# Altium PCB pcb.PcbDoc (part 2 of 2)
Units mil, origin at the board's own origin, x right, y up, seen from the top; angles counter-clockwise.
Board outline 3937.04 x 2086.65 mil, 2 copper layers (Top Layer, Bottom Layer), stack 62.205 mil thick; 127 components, 118 nets, 535 pads, 195 vias.
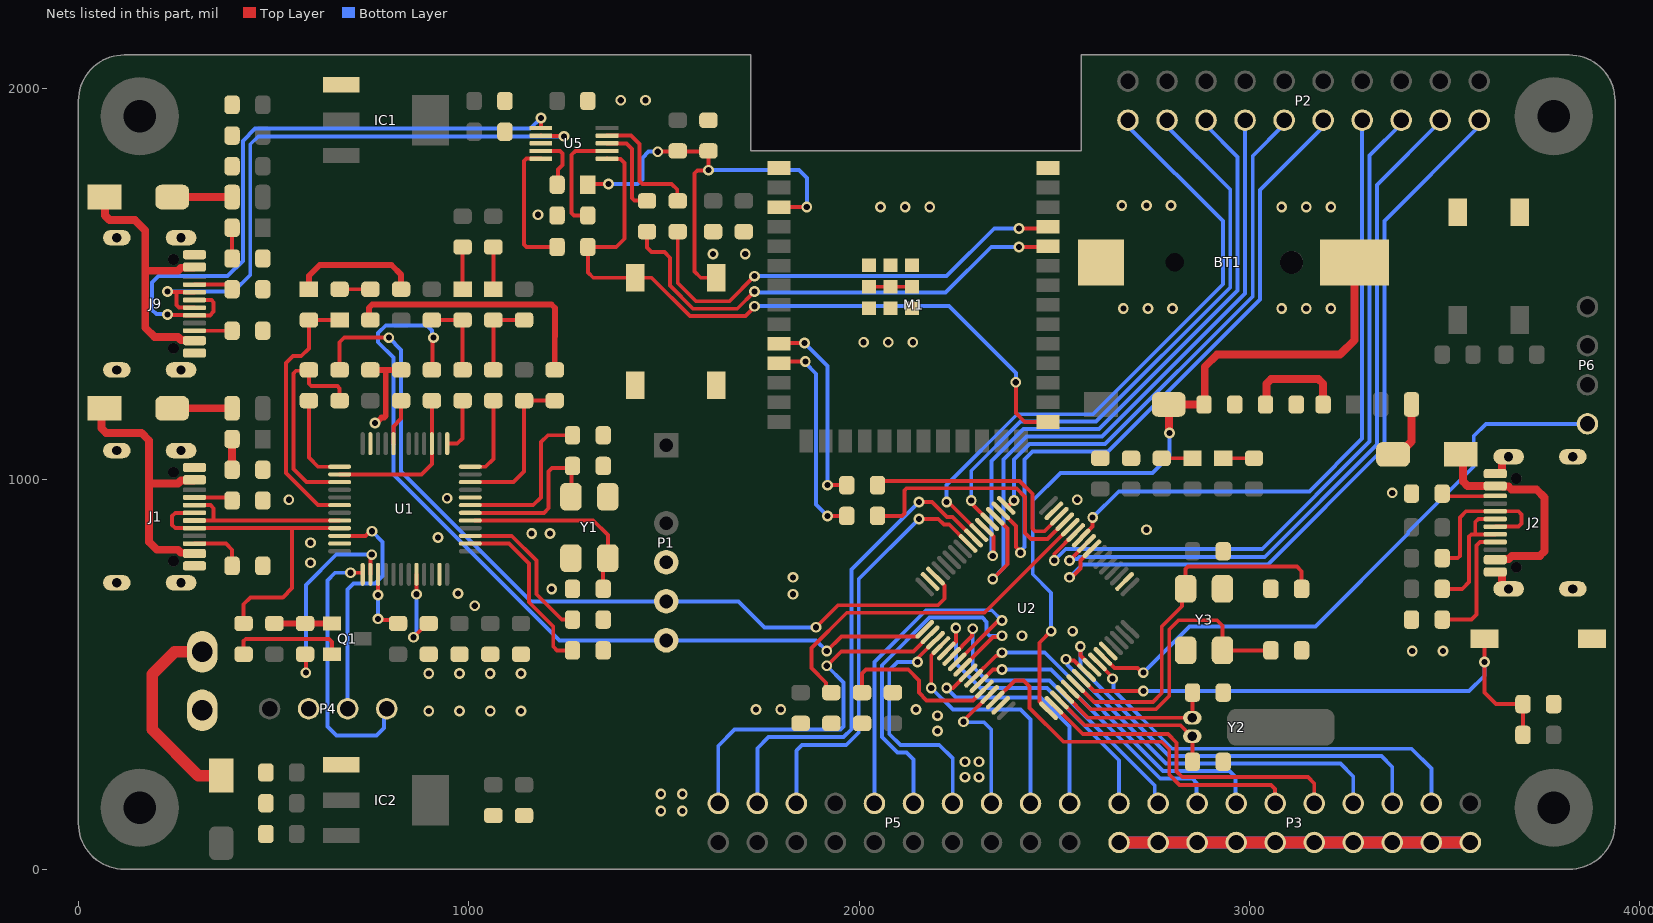
[diagram p2: the nets of this part, all layers, seen from the top]

## Via types
v1: diameter 27.56, hole 15.75, Top Layer to Bottom Layer, tented both sides, 161 vias
v2: diameter 43.31, hole 23.62, Top Layer to Bottom Layer, 32 vias
v3: diameter 27.56, hole 15.75, Top Layer to Bottom Layer, 2 vias

## Nets (pads, with @x,y where several pads share a name; then routed paths per layer and width w, separated by ;. In a path a pad name is that pad's centre, name@x,y a point inside that pad or via, vN(x,y) a via of type N, cw(c..) or ccw(c..) an arc to the next point about the centre after c; other vN are vias at no path point) (continued)
A13: P1.5 R24.1 U2.46 | length 2213.4
  Top Layer w10: R24.1@669.29,1279.52 669.29,1350.4 681.1,1362.2 v1(795.28,1362.2) ; v1(1889.53,620.31) 1890,620.31 1946.17,676.48 2202.07,676.48 2218.95,693.35 2218.95,727.84 2195.86,750.93 U2.46@2195.86,751.42
  Bottom Layer w10: v1(795.28,1362.2) 826.77,1330.71 826.77,1019 1159.15,686.61 P1.5@1505.91,686.61 1691.34,686.61 1757.87,620.08 1889.29,620.08 v1(1889.53,620.31)
A14: P1.6 R16.1 U2.49 | length 2206.5
  Top Layer w10: R16.1@905.51,1279.52 907.48,1281.49 907.48,1360.24 v1(909.45,1362.2) ; v1(1917.32,559.06) 1917.32,559.39 1954.5,596.56 2149.58,596.56 U2.49@2168.03,615.01
  Bottom Layer w10: v1(909.45,1362.2) 906.09,1365.56 906.09,1380.78 893.17,1393.7 787.4,1393.7 767.72,1374.02 767.72,1350.39 807.09,1311.02 807.09,1011.81 1232.28,586.61 P1.6@1505.91,586.61 1889.76,586.61 v1(1917.32,559.06)
A15: P5.19 U2.50 | length 960.3
  Top Layer w10: v1(1917.32,521.5) 1917.64,521.5 1954.42,558.28 2139.13,558.28 U2.50@2181.94,601.09
  Bottom Layer w10: P5.19@1639.37,168.9 1639.37,316.54 1681.1,358.27 1952.76,358.27 1960.63,366.14 1960.63,478.19 v1(1917.32,521.5)
B0: P2.8 U2.26 | length 1654.7
  Top Layer w10: U2.26@2568.9,848.85 2598.43,878.37 v1(2598.43,901.57)
  Bottom Layer w10: v1(2598.43,901.57) 2665.35,968.5 3153.54,968.5 3288.98,1103.94 P2.8@3288.98,1919.29
B1: P2.6 U2.27 | length 1885.3
  Top Layer w10: v1(2500,791.34) 2500,807.79 U2.27@2554.99,862.77
  Bottom Layer w10: v1(2500,791.34) 2529.53,820.87 3032.97,820.87 3307.98,1095.87 3307.98,1828.33 3388.98,1909.33 P2.6@3388.98,1919.29
B2/boot1: R20.1 U2.28 | length 926.8
  Top Layer w10: R20.1@1929.13,452.76 1915.66,466.23 1915.66,478.04 1877.95,515.75 1877.95,566.93 1968.5,657.48 2321.86,657.48 U2.28@2541.07,876.69
B3: P5.11 U2.55 | length 913.7
  Top Layer w10: U2.55@2251.54,531.49 2354.49,634.44 2362.78,634.44 v1(2366.14,637.8)
  Bottom Layer w10: P5.11@2039.37,168.9 2039.37,531.5 2171.76,663.89 2340.05,663.89 v1(2366.14,637.8)
B4: P5.9 U2.56 | length 929.3
  Top Layer w10: U2.56@2265.46,517.57 2265.53,517.57 2343.03,595.07 2362.78,595.07 v1(2366.14,598.43)
  Bottom Layer w10: P5.9@2139.37,168.9 2139.37,281.89 2122.05,299.21 2098.43,299.21 2058.37,339.27 2058.37,522.94 2180.32,644.89 2315.74,644.89 2326.77,633.86 2326.77,606.3 2334.65,598.43 v1(2366.14,598.43)
B5: P5.1 U2.57 | length 624.1
  Top Layer w10: v1(2224.41,464.57) 2240.3,464.57 U2.57@2279.38,503.65
  Bottom Layer w10: v1(2224.41,464.57) 2248.31,440.67 2464.84,440.67 2539.37,366.14 P5.1@2539.37,168.9
B6: P3.13 U2.58 | length 899.6
  Top Layer w10: U2.58@2293.3,489.73 2350.81,547.24 2360.28,547.24 2366.14,553.1 v1(2366.14,555.12)
  Bottom Layer w10: v1(2366.14,555.12) 2475.69,555.12 2778.84,251.97 2948.82,251.97 2964.57,236.22 2964.57,170.47 P3.13@2966.14,168.9
B7: P3.15 U2.59 | length 745.9
  Top Layer w10: U2.59@2307.22,475.81 2343.22,511.81 v1(2366.14,511.81)
  Bottom Layer w10: v1(2366.14,511.81) 2492.13,511.81 2771.65,232.28 2853.94,232.28 2864.87,221.35 2864.87,170.17 P3.15@2866.14,168.9
B8: P5.5 U2.61 | length 366.6
  Top Layer w10: v1(2267.72,377.95) 2267.72,380.63 U2.61@2335.06,447.97
  Bottom Layer w10: v1(2267.72,377.95) 2268.94,376.73 2320.12,376.73 2338.58,358.27 2338.58,169.68 P5.5@2339.37,168.9
B9: P3.11 U2.62 | length 960.4
  Top Layer w10: U2.62@2348.98,434.05 2399.18,484.25 2421.26,484.25 2437.01,468.5 2437.01,413.39 2523.62,326.77 2775.59,326.77 2794.59,307.77 2794.59,242.81 2820.87,216.54 3055.12,216.54 3066.05,205.6 3066.05,168.98 P3.11@3066.14,168.9
B10: R27.2 U2.29 | length 670
  Top Layer w10: R27.2@2047.25,905.52 2110.28,905.51 2116.14,911.37 2116.14,970.52 2122,976.38 2403.23,976.38 2425.2,954.42 2425.2,862.2 2440.94,846.46 2482.99,846.46 U2.29@2527.15,890.61
B11: R28.2 U2.30 | length 592.5
  Top Layer w10: R28.2@2047.24,984.25 2058.37,995.38 2411.1,995.38 2444.2,962.29 2444.2,872.73 2450.79,866.14 2474.84,866.14 U2.30@2513.23,904.53
B12: P2.12 U2.33 | length 1402.4
  Top Layer w10: U2.33@2376.82,932.37 2379.99,929.2 2381.17,929.2 v1(2396.86,944.88)
  Bottom Layer w10: v1(2396.86,944.88) 2396.86,1049.91 2436.81,1089.87 2630.42,1089.87 3008.56,1468.01 3008.56,1827.46 3088.98,1907.87 P2.12@3088.98,1919.29
B13: P2.10 U2.34 | length 1671.3
  Top Layer w10: U2.34@2362.9,918.45 2401.57,879.77 2401.57,825.66 2413.39,813.85 v1(2413.39,811.02)
  Bottom Layer w10: v1(2413.39,811.02) 2413.39,815.41 2423.64,825.66 2423.64,1049.82 2444.68,1070.87 2638.29,1070.87 3027.56,1460.14 3027.56,1740.16 3188.98,1901.57 P2.10@3188.98,1919.29
B14: P2.14 U2.35 | length 1745.3
  Top Layer w10: v1(2342.52,744.09) 2380.08,781.65 2380.08,873.43 U2.35@2348.98,904.53
  Bottom Layer w10: v1(2342.52,744.09) 2370.08,771.65 2370.08,1050 2428.94,1108.87 2550.5,1108.87 2622.55,1108.87 2988.98,1475.3 P2.14@2988.98,1919.29
B15: P2.18 U2.36 | length 1503.8
  Top Layer w10: v1(2287.4,944.88) 2290.76,941.52 2290.76,934.91 U2.36@2335.06,890.61
  Bottom Layer w10: v1(2287.4,944.88) 2287.4,1021.06 2413.2,1146.87 2534.76,1146.87 2606.81,1146.87 2950.98,1491.04 2950.98,1563.08 2950.98,1741.54 2788.98,1903.54 P2.18@2788.98,1919.29
BATT: BT1.1 C23.2 D4.2 U2.1 | length 1909.6
  Top Layer w10: U2.1@2485.39,406.21 2485.39,406.7 2462.31,429.79 2462.31,580.42 v1(2492.13,610.24)
  Top Layer w20: v1(2795.28,1118.11) 2794.29,1119.09 2794.29,1189.96 D4.2@2793.31,1190.94 C23.2@2883.86,1190.94 2885.83,1192.91 2885.83,1287.4 2917.32,1318.9 3232.28,1318.9 3269.69,1356.3 BT1.1@3269.69,1555.12
  Bottom Layer w10: v1(2492.13,610.24) 2492.13,708.66 2444.88,755.91 2444.88,944.88 2515.75,1015.75 2751.97,1015.75 2795.28,1059.06 v1(2795.28,1118.11)
BOOT: BOOT.1 M1.27 R49.1 U5.6 | length 1830.9
  Top Layer w10: U5.6@1354.3,1820.65 1354.81,1820.14 1388.52,1820.14 1399.01,1809.65 1399.01,1615.54 1377.95,1594.49 R49.1@1305.11,1594.49 1305.11,1529.53 1318.9,1515.75 BOOT.1@1427.17,1515.75 1468.5,1515.75 1566.93,1417.32 1708.66,1417.32 1732.28,1440.94 v1(1732.28,1442.76) ; v1(2401.57,1248.03) 2401.57,1169.29 2424.41,1146.46 M1.27@2484.25,1146.46
  Bottom Layer w10: v1(1732.28,1442.76) 2230.47,1442.76 2401.57,1271.65 v1(2401.57,1248.03)
BOOT0: R4.1 U1.44 | length 218.7
  Top Layer w10: v1(858.27,594.49) 893.7,629.92 R4.1@897.64,629.92 ; v1(866.14,704.72) U1.44@866.14,755.91
  Bottom Layer w10: v1(858.27,594.49) 858.27,599.24 866.14,607.11 v1(866.14,704.72)
BOOT1: R7.1 U1.20 | length 118.4
  Top Layer w10: U1.20@807.08,1090.55 807.08,1134.84 826.77,1154.52 R7.1@826.77,1200.79
C0: P3.7 U2.8 | length 1002.1
  Top Layer w10: v1(2530.49,538.19) 2533.25,535.43 2551.04,535.43 U2.8@2582.82,503.65
  Bottom Layer w10: v1(2530.49,538.19) 2533.84,534.83 2533.84,523.83 2547.93,509.75 2786.71,270.97 3232.97,270.97 3266.14,237.8 P3.7@3266.14,168.9
C1: P3.5 U2.9 | length 1117
  Top Layer w10: v1(2566.93,570.87) 2566.93,547.38 U2.9@2596.74,517.57
  Bottom Layer w10: v1(2566.93,570.87) 2566.93,517.62 2794.58,289.97 3338.03,289.97 3366.14,261.86 P3.5@3366.14,168.9
C2: P3.3 U2.10 | length 1076
  Top Layer w10: U2.10@2610.66,531.49 2610.66,531 2649.61,492.06 v1(2649.61,488.19)
  Bottom Layer w10: v1(2649.61,488.19) 2652.01,485.79 2652.01,459.41 2802.45,308.97 3415.44,308.97 3466.14,258.27 P3.3@3466.14,168.9
C3: P6.1 U2.11 | length 1571.2
  Top Layer w10: U2.11@2624.58,545.41 2654.24,515.75 2713.71,515.75 2725.52,503.94 v1(2728.35,503.94)
  Bottom Layer w10: v1(2728.35,503.94) 2846.17,621.76 3169.01,621.76 3407.14,859.89 3407.14,864.52 3574.8,1032.19 3574.8,1110.24 3605.91,1141.34 P6.1@3866.14,1141.34
C4: P2.2 U2.24 | length 1983.5
  Top Layer w10: v1(2539.37,748.03) 2544.12,748.03 2566.93,770.84 2566.93,791.2 U2.24@2596.74,821.01
  Bottom Layer w10: v1(2539.37,748.03) 2572.75,781.41 3047.26,781.41 3345.98,1080.13 3345.98,1660.94 3588.98,1903.94 P2.2@3588.98,1919.29
C5: P2.4 U2.25 | length 1870.5
  Top Layer w10: v1(2539.37,791.34) v1(2539.37,791.34) 2582.82,834.86 U2.25@2582.82,834.93
  Bottom Layer w10: v1(2539.37,791.34) 2542.73,794.7 2559.17,794.7 2564.88,800.41 3039.39,800.41 3326.98,1088 3326.98,1753.75 3488.98,1915.75 P2.4@3488.98,1919.29
C6: P2.16 U2.37 | length 1609.5
  Top Layer w10: U2.37@2321.14,876.69 2321.14,876.2 2344.22,853.12 2344.22,804.85 v1(2342.52,803.15)
  Bottom Layer w10: v1(2342.52,803.15) 2339.27,806.4 2339.27,1046.06 2421.07,1127.87 2542.63,1127.87 2614.68,1127.87 2969.98,1483.17 2969.98,1555.21 2969.98,1825.3 2888.98,1906.3 P2.16@2888.98,1919.29
C7: P2.20 U2.38 | length 1600.7
  Top Layer w10: v1(2224.41,940.94) 2228.56,940.94 2306.73,862.77 U2.38@2307.22,862.77
  Bottom Layer w10: v1(2224.41,940.94) 2224.41,984.94 2405.33,1165.87 2598.94,1165.87 2931.98,1498.91 2931.98,1660.54 2688.98,1903.54 P2.20@2688.98,1919.29
C8: P5.17 U2.39 | length 1234.1
  Top Layer w10: v1(2153.54,940.94) 2186.54,940.94 2225.13,902.35 2239.8,902.35 U2.39@2293.3,848.85
  Bottom Layer w10: P5.17@1739.37,168.9 1739.37,310.24 1768.4,339.27 1960.63,339.27 1980.32,358.96 1980.32,767.72 v1(2153.54,940.94)
C9: P5.15 U2.40 | length 1076.8
  Top Layer w10: v1(2153.54,897.64) 2202.97,897.64 2217.26,883.35 2230.96,883.35 U2.40@2279.38,834.93
  Bottom Layer w10: P5.15@1839.37,168.9 1839.37,303.94 1854.33,318.9 1967.13,318.9 1999.32,351.09 1999.32,743.41 v1(2153.54,897.64)
C10: P5.7 U2.51 | length 623.1
  Top Layer w10: v1(2149.61,531.5) 2152.97,534.86 2152.97,544.27 U2.51@2195.86,587.17
  Bottom Layer w10: v1(2149.61,531.5) 2098.43,531.5 2077.37,510.44 2077.37,347.14 2106.3,318.21 2205.41,318.21 2240.16,283.46 2240.16,169.68 P5.7@2239.37,168.9
C11: P5.3 U2.52 | length 621.4
  Top Layer w10: v1(2185.04,464.57) 2185.04,548.01 2209.78,572.76 U2.52@2209.78,573.25
  Bottom Layer w10: v1(2185.04,464.57) 2240.16,409.45 2413.39,409.45 2439.37,383.46 P5.3@2439.37,168.9
C12: P3.19 U2.53 | length 790.8
  Top Layer w10: U2.53@2223.7,559.33 2223.7,559.82 2248.03,584.15 v1(2248.03,618.11)
  Bottom Layer w10: v1(2248.03,618.11) 2248.03,527.56 2311.02,464.57 2481,464.57 2666.14,279.43 P3.19@2666.14,168.9
C13: P3.9 U2.2 | length 844
  Top Layer w10: U2.2@2499.31,420.13 2572.98,346.46 2791.34,346.46 2813.59,324.2 2813.59,250.68 2828.05,236.22 3150,236.22 3166.14,220.08 P3.9@3166.14,168.9
CH340_D+: J9.A6 J9.B6 U5.1 | length 1689.7
  Top Layer w10: v1(228.35,1421.26) 229.41,1420.2 272.72,1420.2 273.62,1419.29 336.61,1419.29 346.46,1429.13 346.46,1452.76 340.55,1458.66 J9.A6@297.24,1458.66 ; U5.1@1185.04,1899.43 v1(1185.04,1925.2)
  Bottom Layer w10: v1(228.35,1421.26) 227.13,1422.48 199.57,1422.48 188.98,1433.07 188.98,1503.94 204.72,1519.68 381.89,1519.68 421.26,1559.06 421.26,1866.14 452.76,1897.64 1157.48,1897.64 v1(1185.04,1925.2)
CH340_D-: J9.A7 J9.B7 U5.2 | length 1588.5
  Top Layer w10: v1(228.35,1480.32) 229.41,1479.25 251.06,1479.25 ; J9.A7@297.24,1438.98 297.02,1439.2 257.65,1439.2 251.06,1445.79 251.06,1479.25 ; J9.B7@297.24,1478.35 273.62,1478.35 272.72,1479.25 251.06,1479.25 ; U5.2@1185,1879.71 1185.52,1879.2 1242.85,1879.2 v1(1244.09,1877.95)
  Bottom Layer w10: v1(228.35,1480.32) 397.64,1480.32 440.26,1522.94 440.26,1857.58 460.63,1877.95 v1(1244.09,1877.95)
CH340_RX: R52.2 U5.9 | length 321.8
  Top Layer w10: U5.9@1354.3,1879.71 1415.57,1879.71 1437.01,1858.27 1437.01,1763.78 1444.88,1755.91 1519.69,1755.91 1534.16,1741.43 1534.16,1713.87 R52.2@1535.43,1712.6
CH340_TX: R56.2 U5.8 | length 237.3
  Top Layer w10: U5.8@1354.3,1860.02 1403.76,1860.02 1418.01,1845.77 1418.01,1719.79 1423.93,1713.87 1455.42,1713.87 R56.2@1456.69,1712.6
D2: P3.17 U2.54 | length 831.8
  Top Layer w10: U2.54@2237.62,545.41 2289.59,597.37 2289.59,614.57 v1(2291.34,616.32)
  Bottom Layer w10: v1(2291.34,616.32) 2291.34,519.69 2326.77,484.25 2488.19,484.25 2757.51,214.93 2757.51,177.53 P3.17@2766.14,168.9
DN1: J1.A7 J1.B7 U1.32 | length 456
  Top Layer w10: J1.A7@297.24,893.7 346.46,893.7 ; J1.B7@297.24,933.07 338.58,933.07 346.46,925.2 346.46,893.7 ; U1.32@669.29,893.7 346.46,893.7
DN2: J2.A7 J2.B7 R40.2 | length 347.7
  Top Layer w10: R40.2@3494.1,718.51 3545.28,718.51 3562.99,736.22 3562.99,852.41 3568.85,858.27 3578.74,858.27 ; J2.B7@3629.92,858.27 3578.74,858.27 ; J2.A7@3629.92,897.64 3586.61,897.64 3578.74,889.76 3578.74,858.27
DP1: J1.A6 J1.B6 R11.2 U1.33 | length 861.9
  Top Layer w10: J1.A6@297.24,913.39 248.03,913.39 240.16,905.51 240.16,881.89 248.03,874.02 J1.B6@297.24,874.02 547.24,874.02 551.18,874.02 ; R11.2@423.23,629.92 423.23,679.13 440.94,696.85 523.62,696.85 547.24,720.47 547.24,870.08 551.18,874.02 ; U1.33@669.29,874.03 551.18,874.02
DP2: J2.A6 J2.B6 R41.2 | length 407.3
  Top Layer w10: R41.2@3494.09,797.24 3533.51,797.24 3539.37,803.1 3539.37,901.57 3555.12,917.32 J2.B6@3629.92,917.32 3688.98,917.32 3696.85,909.45 3696.85,885.83 3688.98,877.95 J2.A6@3629.92,877.95
ESP_RST: C43.2 D7.1 ESP_RST.1 M1.3 R59.1 | length 1184.7
  Top Layer w10: D7.1@1305.12,1753.94 1307.09,1755.91 v1(1358.27,1755.91) ; v1(1484.25,1838.58) 1485.24,1839.57 1613.19,1839.57 C43.2@1614.17,1840.55 v1(1614.17,1791.34) 1613.67,1790.83 1586.11,1790.83 1578.74,1783.46 1578.74,1531.5 1594.49,1515.75 ESP_RST.1@1633.86,1515.75 ; M1.3@1795.28,1696.46 1795.67,1696.85 v1(1866.14,1696.85)
  Bottom Layer w10: v1(1358.27,1755.91) 1433.07,1755.91 1444.88,1767.72 1444.88,1822.83 1460.63,1838.58 v1(1484.25,1838.58) ; v1(1614.17,1791.34) 1846.46,1791.34 1866.14,1771.65 v1(1866.14,1696.85)
GND: A0.1 A1.1 BOOT.2 BT1.2 C1.2 C2.2 C3.1 C4.2 C5.2 C6.2 C7.2 C8.2 C9.1 C10.1 C11.2 C12.1 C13.1 C14.1 C15.2 C16.1 C17.1 C18.2 C19.1 C20.2 C21.2 C23.1 C29.1 C30.1 C31.1 C32.1 C33.1 C39.1 C40.1 C41.1 C43.1 C44.1 C45.1 ESP_RST.2 IC1.1 IC2.1 J1.A1B12 J1.B1A12 J1.SH1 J1.SH2 J1.SH3 J1.SH4 J2.A1B12 J2.B1A12 J2.SH1 J2.SH2 J2.SH3 J2.SH4 J9.A1B12 J9.B1A12 J9.SH1 J9.SH2 J9.SH3 J9.SH4 J12.1 M1.1 M1.40 M1.41 P1.4 P3.2 P3.4 P3.6 P3.8 P3.10 P3.12 P3.14 P3.16 P3.18 P3.20 P4.3 R1.2 R2.2 R3.2 R4.2 R5.2 R7.2 R10.2 R12.2 R14.2 R18.2 R20.2 R36.2 R37.2 R47.2 R48.1 R50.1 R62.2 STM_RST.1 U1.8 U1.23 U1.35 U1.47 U2.12 U2.18 U2.31 U2.47 U2.63 U5.3 Y1.2 Y1.4 Y3.2 Y3.4 | length 2959.8
  Top Layer w10: M1.41@2025.59,1492.52 M1.41@2135.83,1492.52
  Top Layer w15: C7.2@748.03,1279.53 787.4,1279.53 ; R10.2@748.03,1407.48 744.09,1411.42 744.09,1438.07 752.88,1446.85 1212.13,1446.85 1220.92,1438.07 1220.92,1365.03 1220.47,1364.58 R12.2@1220.47,1279.53 ; v1(759.62,1143.68) 763.02,1143.68 776.83,1157.48 783.46,1157.48 787.34,1161.36 787.34,1279.47 787.4,1279.53 ; R7.2@826.77,1279.53 787.4,1279.53
  Top Layer w20: J2.A1B12@3629.92,761.81 3645.24,761.81 3647.05,760 3647.05,727.45 3656,718.5 J2.SH4@3664.17,718.5 ; J2.B1A12@3629.92,1013.78 3645.24,1013.78 3647.05,1015.59 3647.05,1048.14 3656,1057.09 J2.SH3@3664.17,1057.09
  Top Layer w30: P3.20@2666.14,68.9 P3.18@2766.14,68.9 P3.16@2866.14,68.9 P3.14@2966.14,68.9 P3.12@3066.14,68.9 P3.10@3166.14,68.9 P3.8@3266.14,68.9 P3.6@3366.14,68.9 P3.4@3466.14,68.9 P3.2@3566.14,68.9
  Bottom Layer w30: P3.20@2666.14,68.9 P3.2@3566.14,68.9
  other v1: 1492.13,149.61 1547.24,149.61 1492.13,192.91 1547.24,192.91 2271.65,236.22 2307.09,236.22 2271.65,275.59 2307.09,275.59 2200.79,354.33 2200.79,393.7 897.64,405.51 976.38,405.51 1055.12,405.51 1133.86,405.51 1736.22,409.45 1799.21,409.45 2145.67,409.45 897.42,501.94 976.16,501.94 1054.9,501.94 1133.64,501.94 3417.32,559.06 3496.06,559.06 2417.32,598.43 2547.24,610.24 1015.53,675.17 1830.71,704.72 972.22,706.67 1212.38,718.48 1830.71,748.03 594.27,785.41 594.27,836.59 921.26,850.39 1161.2,860.21 1208.44,860.21 2736.22,870.08 539.15,946.83 2558.84,946.83 944.66,950.76 3366.14,964.57 2011.81,1350.39 2074.8,1350.39 2137.8,1350.39 2677.17,1437.01 2740.16,1437.01 2803.15,1437.01 3082.68,1437.01 3145.67,1437.01 3208.66,1437.01 1625.76,1576.75 1708.44,1576.75 1177.17,1677.17 2055.12,1696.85 2118.11,1696.85 2181.1,1696.85 3082.68,1696.85 3145.67,1696.85 3208.66,1696.85 2673.23,1700.79 2736.22,1700.79 2799.21,1700.79 1389.54,1970.45 1452.54,1970.45
LED: LED2.1 LED3.2 U1.30 | length 679.4
  Top Layer w10: U1.30@669.29,933.07 614.17,933.07 531.5,1015.75 531.5,1296.77 549.69,1314.96 570.87,1314.96 590.55,1334.65 LED3.2@590.55,1407.48 LED2.1@669.29,1407.48
NetA6_1: A6.1 R29.2 | length 78.7
  Top Layer w10: A6.1@2933.07,1053.15 R29.2@3011.81,1053.15
NetA7_1: A7.1 R30.2 | length 78.7
  Top Layer w10: R30.2@2775.59,1053.15 A7.1@2854.33,1053.15
NetC1_1: C1.1 U1.5 Y1.1 | length 498.7
  Top Layer w10: U1.5@1015.75,893.7 1318.9,893.7 1356.3,856.3 Y1.1@1356.3,797.24 1344.49,785.43 C1.1@1344.49,718.5
NetC2_1: C2.1 U1.7 | length 419
  Top Layer w10: U1.7@1003.93,933.07 1165.35,933.07 1185.04,952.76 1185.04,1094.49 1202.76,1112.2 C2.1@1265.75,1112.2
NetC3_2: C3.2 U1.6 Y1.3 | length 447.3
  Top Layer w10: U1.6@1003.93,913.4 1192.92,913.4 1204.72,925.2 1204.72,1019.68 1213.3,1028.26 1260.54,1028.26 C3.2@1265.75,1033.46 1263.78,1031.5 1263.78,956.69 Y1.3@1261.81,954.72
NetC13_2: C13.2 U2.3 Y2.2 | length 444.3
  Top Layer w10: U2.3@2513.23,434.05 2578.04,369.24 2823.49,369.24 2851.73,340.99 Y2.2@2853.83,340.99 ; C13.2@2854.08,275.84 Y2.2@2854.08,340.99
NetC14_2: C14.2 U2.4 Y2.1 | length 416.2
  Top Layer w10: U2.4@2527.15,447.97 2586.88,388.24 Y2.1@2853.83,388.24 2854.08,388.49 2854.08,392.02 2854.08,452.51 C14.2@2854.33,452.76
NetC20_1: C20.1 U2.5 Y3.3 | length 798.3
  Top Layer w10: U2.5@2541.07,461.89 2592.82,410.13 2760.53,410.13 2794.59,444.2 2794.59,614.18 2818.55,638.14 2916.98,638.14 2931.1,624.02 Y3.3@2931.1,561.02 C20.1@3055.12,561.02
NetC21_1: C21.1 U2.6 Y3.1 | length 942.2
  Top Layer w10: U2.6@2554.99,475.81 2601.66,429.13 2752.66,429.13 2775.59,452.07 2775.59,622.05 2827.47,673.93 2827.47,709.36 Y3.1@2836.61,718.5 2836.61,769.68 2842.52,775.59 3122.05,775.59 3133.86,763.78 C21.1@3133.86,718.5
NetC40_2: C40.2 U5.7 | length 287.9
  Top Layer w10: C40.2@1305.12,1675.2 1269.69,1675.2 1263.78,1681.1 1263.78,1830.71 1273.41,1840.34 U5.7@1354.3,1840.34
NetD1_1: D1.1 J12.2 | length 519.7
  Top Layer w30: J12.2@317.01,557.28 246.26,557.28 188.98,500 188.98,358.27 307.22,240.02 366.01,240.02 D1.1@366.14,240.16
NetD5_1: D5.1 J1.A4B9 J1.B4A9 | length 697.9
  Top Layer w20: D5.1@66.93,1181.1 59.06,1173.23 59.06,1129.83 70.77,1118.11 161.42,1118.11 181.1,1098.43 181.1,988.54 ; J1.B4A9@297.24,809.06 279.53,809.06 277.72,810.87 262.91,810.87 255.23,818.54 201.14,818.54 181.1,838.58 181.1,988.54 ; J1.A4B9@297.24,998.03 295.43,996.22 262.91,996.22 255.23,988.54 181.1,988.54
NetD5_2: D5.2 F1.1 | length 153.5
  Top Layer w20: D5.2@240.16,1181.1 F1.1@393.7,1181.1
NetD6_1: D6.1 J9.A4B9 J9.B4A9 | length 686.4
  Top Layer w20: D6.1@66.93,1722.44 67.91,1721.46 67.91,1675.1 79.63,1663.39 144.69,1663.39 171.26,1636.81 171.26,1535.43 ; J9.B4A9@297.24,1354.33 279.53,1354.33 277.72,1356.14 262.91,1356.14 255.23,1363.82 195.24,1363.82 171.26,1387.8 171.26,1535.43 ; J9.A4B9@297.24,1543.31 295.43,1541.5 262.91,1541.5 255.23,1533.82 172.87,1533.82 171.26,1535.43
NetD6_2: D6.2 F3.1 | length 153.5
  Top Layer w20: D6.2@240.16,1722.44 F3.1@393.7,1722.44
NetD7_2: D7.2 U5.4 | length 143.8
  Top Layer w10: U5.4@1185,1840.34 1234.3,1840.34 1240.16,1834.48 1240.16,1804.38 1228.34,1792.56 1228.34,1755.9 D7.2@1226.38,1753.94
NetD8_1: D8.1 J2.A4B9 J2.B4A9 | length 570
  Top Layer w20: D8.1@3541.34,1062.99 3547.24,1057.09 3547.24,994 3558.96,982.28 3647.64,982.28 3649.45,980.47 3664.26,980.47 3671.94,972.8 3735.87,972.8 3755.91,952.76 3755.91,814.87 3744.19,803.15 3672.29,803.15 3664.26,795.12 3631.73,795.12 J2.A4B9@3629.92,793.31
NetD8_2: D8.2 F2.1 | length 155.1
  Top Layer w20: D8.2@3368.11,1062.99 3382.14,1062.99 3415.35,1096.2 F2.1@3415.35,1190.28
NetJ1_A5: J1.A5 R2.1 | length 99.7
  Top Layer w10: J1.A5@297.24,952.76 385.83,952.76 R2.1@393.7,944.89
NetJ1_B5: J1.B5 R1.1 | length 144.3
  Top Layer w10: J1.B5@297.24,834.65 377.95,834.65 393.7,818.89 R1.1@393.7,777.56
NetJ2_A5: J2.A5 R37.1 | length 322
  Top Layer w10: R37.1@3494.09,639.76 3568.89,639.76 3581.99,652.86 3581.99,830.02 3590.55,838.58 J2.A5@3629.92,838.58
NetJ2_B5: J2.B5 R36.1 | length 136.6
  Top Layer w10: R36.1@3494.09,954.72 3495.16,955.79 3629.02,955.79 J2.B5@3629.92,956.69
NetJ9_A5: J9.A5 R48.2 | length 101.3
  Top Layer w10: J9.A5@297.24,1498.03 381.88,1498.03 R48.2@393.7,1486.22
NetJ9_B5: J9.B5 R50.2 | length 96.5
  Top Layer w10: J9.B5@297.24,1379.92 R50.2@393.7,1379.92
NetLED2_2: LED2.2 R10.1 | length 78.7
  Top Layer w10: LED2.2@669.29,1486.22 R10.1@748.03,1486.22
NetLED3_1: LED3.1 R13.1 | length 329.7
  Top Layer w15: LED3.1@590.55,1486.22 590.55,1520.67 618.11,1548.23 802.17,1548.23 826.77,1523.62 R13.1@826.77,1486.22
NetPW1_2: PW1.2 R3.1 | length 78.7
  Top Layer w20: R3.1@393.7,1023.62 PW1.2@393.7,1102.36
NetPW2_2: PW2.2 R47.1 | length 78.7
  Top Layer w10: R47.1@393.7,1564.96 PW2.2@393.7,1643.7
NetPW3_2: PW3.2 R62.1 | length 262.4
  Top Layer w20: R62.1@3041.34,1190.95 3043.78,1193.39 3043.78,1244.19 3055.5,1255.91 3177.26,1255.91 3188.98,1244.19 PW3.2@3188.98,1190.94
NetQ1_1: Q1.1 R6.2 R8.1 | length 147.6
  Top Layer w15: R6.2@501.97,629.92 Q1.1@649.61,629.92
NetQ1_2: Q1.2 R11.1 | length 297.1
  Top Layer w10: R11.1@423.23,551.18 423.23,584.69 429.08,590.55 641.73,590.55 649.61,582.68 Q1.2@649.61,551.18
NetR5_1: R5.1 U2.60 | length 409.7
  Top Layer w10: R5.1@2007.88,452.75 2007.88,501.75 2017.93,511.81 2125.98,511.81 2153.54,484.25 2153.54,452.76 2173.23,433.07 2291.83,433.07 U2.60@2307.03,448.27
NetR17_2: R17.2 TX.1 | length 108.3
  Top Layer w10: TX.1@1062.99,1486.22 R17.2@1063,1594.49
NetR21_2: R21.2 RX.1 | length 108.3
  Top Layer w10: RX.1@984.25,1486.22 R21.2@984.26,1594.49
NetR49_2: R49.2 U5.5 | length 347.2
  Top Layer w10: U5.5@1185,1820.65 1147.59,1820.65 1141.73,1814.79 1141.73,1600.34 1147.59,1594.49 R49.2@1226.37,1594.49
NRST: C39.2 R42.2 STM_RST.2 U2.7 | length 1426.1
  Top Layer w10: U2.7@2568.9,489.73 2601.94,456.69 v1(2728.35,456.69) ; STM_RST.2@3602.36,590.55 v1(3602.36,531.5) 3602.36,452.76 3631.89,423.23 C39.2@3700.79,423.23 R42.2@3700.78,344.49
  Bottom Layer w10: v1(2728.35,456.69) 3562.99,456.69 3602.36,496.06 v1(3602.36,531.5)
PA0: R9.1 R12.1 U1.10 | length 409.1
  Top Layer w10: U1.10@1003.93,992.13 1114.18,992.13 1141.73,1019.69 1141.73,1047.24 R9.1@1141.73,1200.79 R12.1@1220.47,1200.79
PA2: R15.2 U1.12 | length 216.8
  Top Layer w10: U1.12@1003.93,1031.5 1043.32,1031.5 1063,1051.18 R15.2@1063,1200.78
PA3: R19.2 U1.13 | length 141.6
  Top Layer w10: U1.13@944.88,1090.55 970.52,1090.55 984.26,1104.29 R19.2@984.26,1200.78
PB3: R22.1 U1.39 | length 172.9
  Top Layer w10: v1(767.72,641.73) 771.08,638.37 803.96,638.37 807.21,641.61 R22.1@818.9,629.92 ; v1(767.72,703.17) U1.39@767.71,755.91
  Bottom Layer w10: v1(767.72,641.73) v1(767.72,703.17)
PB12: R23.2 U1.25 | length 234.2
  Top Layer w10: R23.2@590.56,1200.78 590.56,1055.11 614.16,1031.5 U1.25@669.29,1031.5
PB14: R23.1 R24.2 U1.27 | length 570.7
  Top Layer w10: U1.27@669.29,992.13 584.64,992.13 551.18,1025.59 551.18,1270.67 557.79,1277.28 588.32,1277.28 R23.1@590.56,1279.52 590.56,1244.05 596.42,1238.19 663.39,1238.19 669.29,1232.28 R24.2@669.29,1200.78
PC13: R14.1 U1.2 | length 463.2
  Top Layer w10: U1.2@1003.93,834.66 1103.04,834.66 1154.23,783.47 1154.23,684.35 1216.54,622.05 1216.54,570.87 1226.38,561.02 R14.1@1265.75,561.02
PC14: R18.1 U1.3 | length 401.4
  Top Layer w10: U1.3@1003.93,854.33 1110.24,854.33 1173.23,791.34 1173.23,704.72 1238.19,639.76 R18.1@1265.75,639.77
RX: M1.10 R28.1 | length 503.6
  Top Layer w10: M1.10@1795.28,1346.46 1797.24,1348.43 v1(1860.24,1348.43) ; v1(1919.29,984.25) R28.1@1968.5,984.25
  Bottom Layer w10: v1(1860.24,1348.43) 1919.29,1289.37 v1(1919.29,984.25)
SWCLK_S: P4.1 U1.37 | length 691.9
  Top Layer w10: v1(696.85,759.84) 728.04,759.84 728.34,759.55 U1.37@728.34,755.91
  Bottom Layer w10: v1(696.85,759.84) 657.48,759.84 637.8,740.16 637.8,366.14 661.42,342.52 763.78,342.52 783.25,361.99 783.25,404.91 P4.1@789.76,411.42
SWCLK_T: R16.2 U1.15 U1.26 | length 409.6
  Top Layer w10: U1.26@669.29,1011.81 878.94,1011.81 905.51,1038.39 U1.15@905.51,1090.55 ; U1.15@905.51,1090.55 R16.2@905.51,1200.78
SWDIO_S: P4.2 U1.34 | length 623.2
  Top Layer w10: U1.34@669.29,854.33 735.41,854.33 747.22,866.14 v1(751.97,866.14)
  Bottom Layer w10: P4.2@689.76,411.42 689.76,717.32 704.72,732.28 759.84,732.28 779.53,751.97 779.53,838.58 v1(751.97,866.14)
TX: M1.11 R27.1 | length 537.8
  Top Layer w10: M1.11@1795.28,1296.46 1800.17,1301.35 v1(1862.37,1301.35) ; v1(1919.29,905.51) R27.1@1968.51,905.52
  Bottom Layer w10: v1(1862.37,1301.35) 1862.37,1297.08 1889.76,1269.68 1889.76,935.04 v1(1919.29,905.51)
U0RXD: M1.36 R56.1 | length 1243.7
  Top Layer w10: R56.1@1456.69,1633.86 1456.69,1592.95 1468.5,1581.13 1501.54,1581.13 1515.75,1566.93 1515.75,1495.37 1574.8,1436.32 1687.98,1436.32 1731.97,1480.32 v1(1732.28,1480.32) ; v1(2409.45,1594.49) 2482.28,1594.49 M1.36@2484.25,1596.46
  Bottom Layer w10: v1(1732.28,1480.32) 1734.76,1477.83 2221.93,1477.83 2338.58,1594.49 v1(2409.45,1594.49)
U0TXD: M1.37 R52.1 | length 1178.9
  Top Layer w10: R52.1@1535.43,1633.86 1535.43,1502.56 1582.67,1455.32 1667.92,1455.32 v1(1732.28,1519.68) ; v1(2409.45,1641.73) 2479.53,1641.73 M1.37@2484.25,1646.46
  Bottom Layer w10: v1(1732.28,1519.68) 2224.41,1519.68 2346.46,1641.73 v1(2409.45,1641.73)
UART_RX: R19.1 R46.1 RX.2 | length 206.7
  Top Layer w10: R46.1@905.51,1407.48 RX.2@984.25,1407.48 R19.1@984.26,1279.52
UART_TX: R15.1 R39.2 TX.2 | length 206.7
  Top Layer w10: R15.1@1063,1279.52 TX.2@1062.99,1407.48 R39.2@1141.74,1407.48
USB_REN: R8.2 U1.38 | length 525.5
  Top Layer w10: R8.2@580.71,551.18 582.68,549.21 v1(582.68,503.94) ; U1.38@748.03,755.92 748.15,756.04 748.15,797.93 751.68,801.46 v1(751.68,806.21)
  Bottom Layer w10: v1(582.68,503.94) 582.68,728.35 660.54,806.21 v1(751.68,806.21)
pads on no net: BT1. J1. J1.A8 J1.B8 J2. J2.A8 J2.B8 J9. J9.A8 J9.B8 M1.4 M1.5 M1.6 M1.7 M1.8 M1.9 M1.12 M1.13 M1.14 M1.15 M1.16 M1.17 M1.18 M1.19 M1.20 M1.21 M1.22 M1.23 M1.24 M1.25 M1.26 M1.28 M1.29 M1.30 M1.31 M1.32 M1.33 M1.34 M1.35 M1.38 M1.39 P1.2 U1.4 U1.11 U1.14 U1.16 U1.17 U1.18 U1.19 U1.21 U1.22 U1.28 U1.29 U1.31 U1.40 U1.41 U1.42 U1.43 U1.45 U1.46 V1.1 V2.1 V3.1 V4.1 Y2.3
copper on no net:
  other v2: 157.48,86.61 3779.53,86.61 107.37,107.37 207.59,107.37 3729.42,107.37 3829.64,107.37 86.61,157.48 228.35,157.48 3708.66,157.48 3850.39,157.48 107.37,207.59 207.59,207.59 3729.42,207.59 3829.64,207.59 157.48,228.35 3779.53,228.35 157.48,1858.27 3779.53,1858.27 107.37,1879.02 207.59,1879.02 3729.42,1879.02 3829.64,1879.02 86.61,1929.13 228.35,1929.13 3708.66,1929.13 3850.39,1929.13 107.37,1979.24 207.59,1979.24 3729.42,1979.24 3829.64,1979.24 157.48,2000 3779.53,2000

## Polygon pours and split planes (outlines as drawn)
GND on Bottom Layer "GND_L02_P000" (solid, remove dead copper, pour order 0): 0,2086.61 3940.94,2086.61 3940.94,-3.94 0,-3.94
GND on Top Layer "GND_L01_P001" (solid, remove dead copper, pour order 1): 0,2086.61 3940.94,2086.61 3940.94,-3.94 0,-3.94

## Keep-outs
Keep-Out Layer:
  the board outline again, w5.91

## Silkscreen, mask and mechanical layers (free items; w line width, h text height)
Top Overlay:
  lines w5.91: 625.98,1763.78 1098.43,1763.78 1145.67,1716.54 1145.67,1590.55 1145.67,1586.61 1192.91,1539.37 1259.84,1539.37 1299.21,1500 1299.21,1437.01 1299.21,1208.66 1338.58,1169.29 1681.1,1169.29 1720.47,1129.92 1720.47,366.14 1665.35,311.02 1515.75,311.02 1480.32,275.59 1480.32,0 ; 633.86,1566.93 633.86,1535.43 ; 661.42,1661.42 661.42,1562.99 633.86,1535.43 ; 665.35,1535.43 633.86,1535.43 ; 881.89,377.95 850.39,409.45 ; 881.89,440.94 850.39,409.45 ; 889.76,1665.35 889.76,1618.11 940.94,1566.93 ; 913.39,1566.93 940.94,1566.93 ; 940.94,1594.49 940.94,1566.93 ; 1074.8,15.75 1074.8,74.8 ; 1171.26,15.75 1171.26,74.8 ; 1220.47,94.49 1220.47,374.02 1185.04,409.45 850.39,409.45 ; 1267.72,15.75 1267.72,74.8 ; 1421.26,94.49 1421.26,346.46 1440.94,366.14 1492.13,366.14 1503.94,377.95 1503.94,519.68 ; 1476.38,492.13 1503.94,519.68 ; 1531.5,492.13 1503.94,519.68 ; 1614.17,637.8 1673.23,637.8 ; 1614.17,734.25 1673.23,734.25 ; 1614.17,830.71 1673.23,830.71 ; 1614.17,925.2 1614.17,543.31 1673.23,543.31 1673.23,925.2 ; 1614.17,925.2 1673.23,925.2 ; 1614.17,925.2 1614.17,1019.69 ; 1614.17,1019.69 1673.23,1019.69 ; 1614.17,1019.69 1614.17,1114.17 1673.23,1114.17 1673.23,1019.69 ; 1673.23,925.2 1673.23,1019.69 ; 980.32,15.75 980.32,74.8 1362.2,74.8 1362.2,15.75 980.32,15.75
  text "Debug+Uart" at 620.08,1674.71 h60
  text "5" at 1626.53,1078.74 h45 r270
  text "." at 1625.98,988.19 h300 r270
  text "3.3" at 1626.53,905.51 h45 r270
  text "G" at 1626.53,795.28 h45 r270
  text "ESP32 to STM32" at 1763.78,736.76 h45
  text "DIO" at 1626.53,720.47 h45 r270
  text "IO17>B11" at 1763.78,681.64 h45
  text "CLK" at 1626.48,629.92 h45 r270
  text "B10 >IO18" at 1763.78,626.53 h45
  text "SWD ST Link" at 1228.89,354.33 h45 r270
  text "SWD STM32" at 1408.91,106.3 h45 r90
  text "3.3" at 1000,28.1 h45
  text "G" at 1110.24,28.1 h45
  text "DIO" at 1185.04,28.1 h45
  text "CLK" at 1275.59,28.06 h45
Bottom Overlay:
  lines w5.91: 1598.43,480.31 2020.41,480.31 ; 2062.99,405.51 2090.55,433.07 ; 2090.55,236.22 2090.55,433.07 ; 2118.11,405.51 2090.55,433.07 ; 2145.67,480.31 2565.95,480.31 ; 2586.61,1968.5 2610.24,1968.5 ; 2625.98,480.31 3035.43,480.31 ; 2629.92,1736.22 2614.17,1736.22 2590.55,1759.84 2590.55,1948.82 2610.24,1968.5 ; 2653.54,1783.46 3094.49,1783.46 ; 3082.68,409.45 3110.24,437.01 ; 3110.24,240.16 3110.24,437.01 ; 3137.8,409.45 3110.24,437.01 ; 3173.23,480.31 3593.51,480.31 ; 3181.1,1783.46 3621.07,1783.46 ; 2610.24,1968.5 2610.24,1944.88 2610.24,1968.5 ; 1582.68,11.81 2594.49,11.81 2594.49,224.41 1582.68,224.41 1582.68,11.81 ; 1582.68,448.82 1582.68,590.55 2496.06,590.55 2586.61,590.55 2586.61,448.82 2496.06,448.82 1582.68,448.82 ; 2610.24,11.81 2610.24,224.41 3622.05,224.41 3622.05,11.81 2610.24,11.81 ; 2610.24,448.82 3523.62,448.82 3614.17,448.82 3614.17,590.55 3523.62,590.55 2610.24,590.55 2610.24,448.82 ; 2633.86,1862.2 2633.86,2074.8 3645.67,2074.8 3645.67,1862.2 2633.86,1862.2 ; 2637.8,1673.23 2637.8,1814.96 3551.18,1814.96 3641.73,1814.96 3641.73,1673.23 3551.18,1673.23 2637.8,1673.23
  text "5V" at 3169.29,1764.56 h65
  text "C4 C5 B1 B0 B13 B12 B14 C6 B15 C7" at 3625.98,1693.66 h62
  text "ESP32 UART" at 408.73,1614.17 h60 r90
  text "ST LINK + UART" at 408.73,1106.3 h60 r90
  text "C3  A3  A4  A5" at 3764.51,1102.36 h62 r270
  text "5V  GND" at 436.29,570.87 h60 r90
  text "B5 C11 B8 C10 B4 B3 A8 C9 C8 A15" at 2574.8,536.21 h65
  text "A2 C2 C1 C0 C13 B9 B6 B7 D2 C12" at 3590.55,536.21 h65
  text "3.3V" at 2137.8,461.41 h65
  text "GND" at 3165.35,461.41 h65
  text "STM32 Discovery" at 1307.09,101.87 h60
  text "Designed by Dang Dang Duong" at 1307.09,42.82 h60

## Text inside footprints (layer, text, board x,y; h text height)
J1: Mechanical 15 "PCB EDGE" at -19.68,667.32 h31.5 r90
J2: Mechanical 15 "PCB EDGE" at 3946.85,1124.02 h31.5 r270
J9: Mechanical 15 "PCB EDGE" at -19.68,1212.6 h31.5 r90